# Altium PCB Control_Board.PcbDoc (part 2 of 4)
Units mm, origin at the board's own origin, x right, y up, seen from the top; angles counter-clockwise.
Board outline 90.17 x 96 mm, 6 copper layers (Top Layer, GND, POWER, Signal, PGND, Bottom Layer), stack 1.346 mm thick; 251 components, 196 nets, 963 pads, 633 vias.
Unrouted connection lines stored in the file: 3.
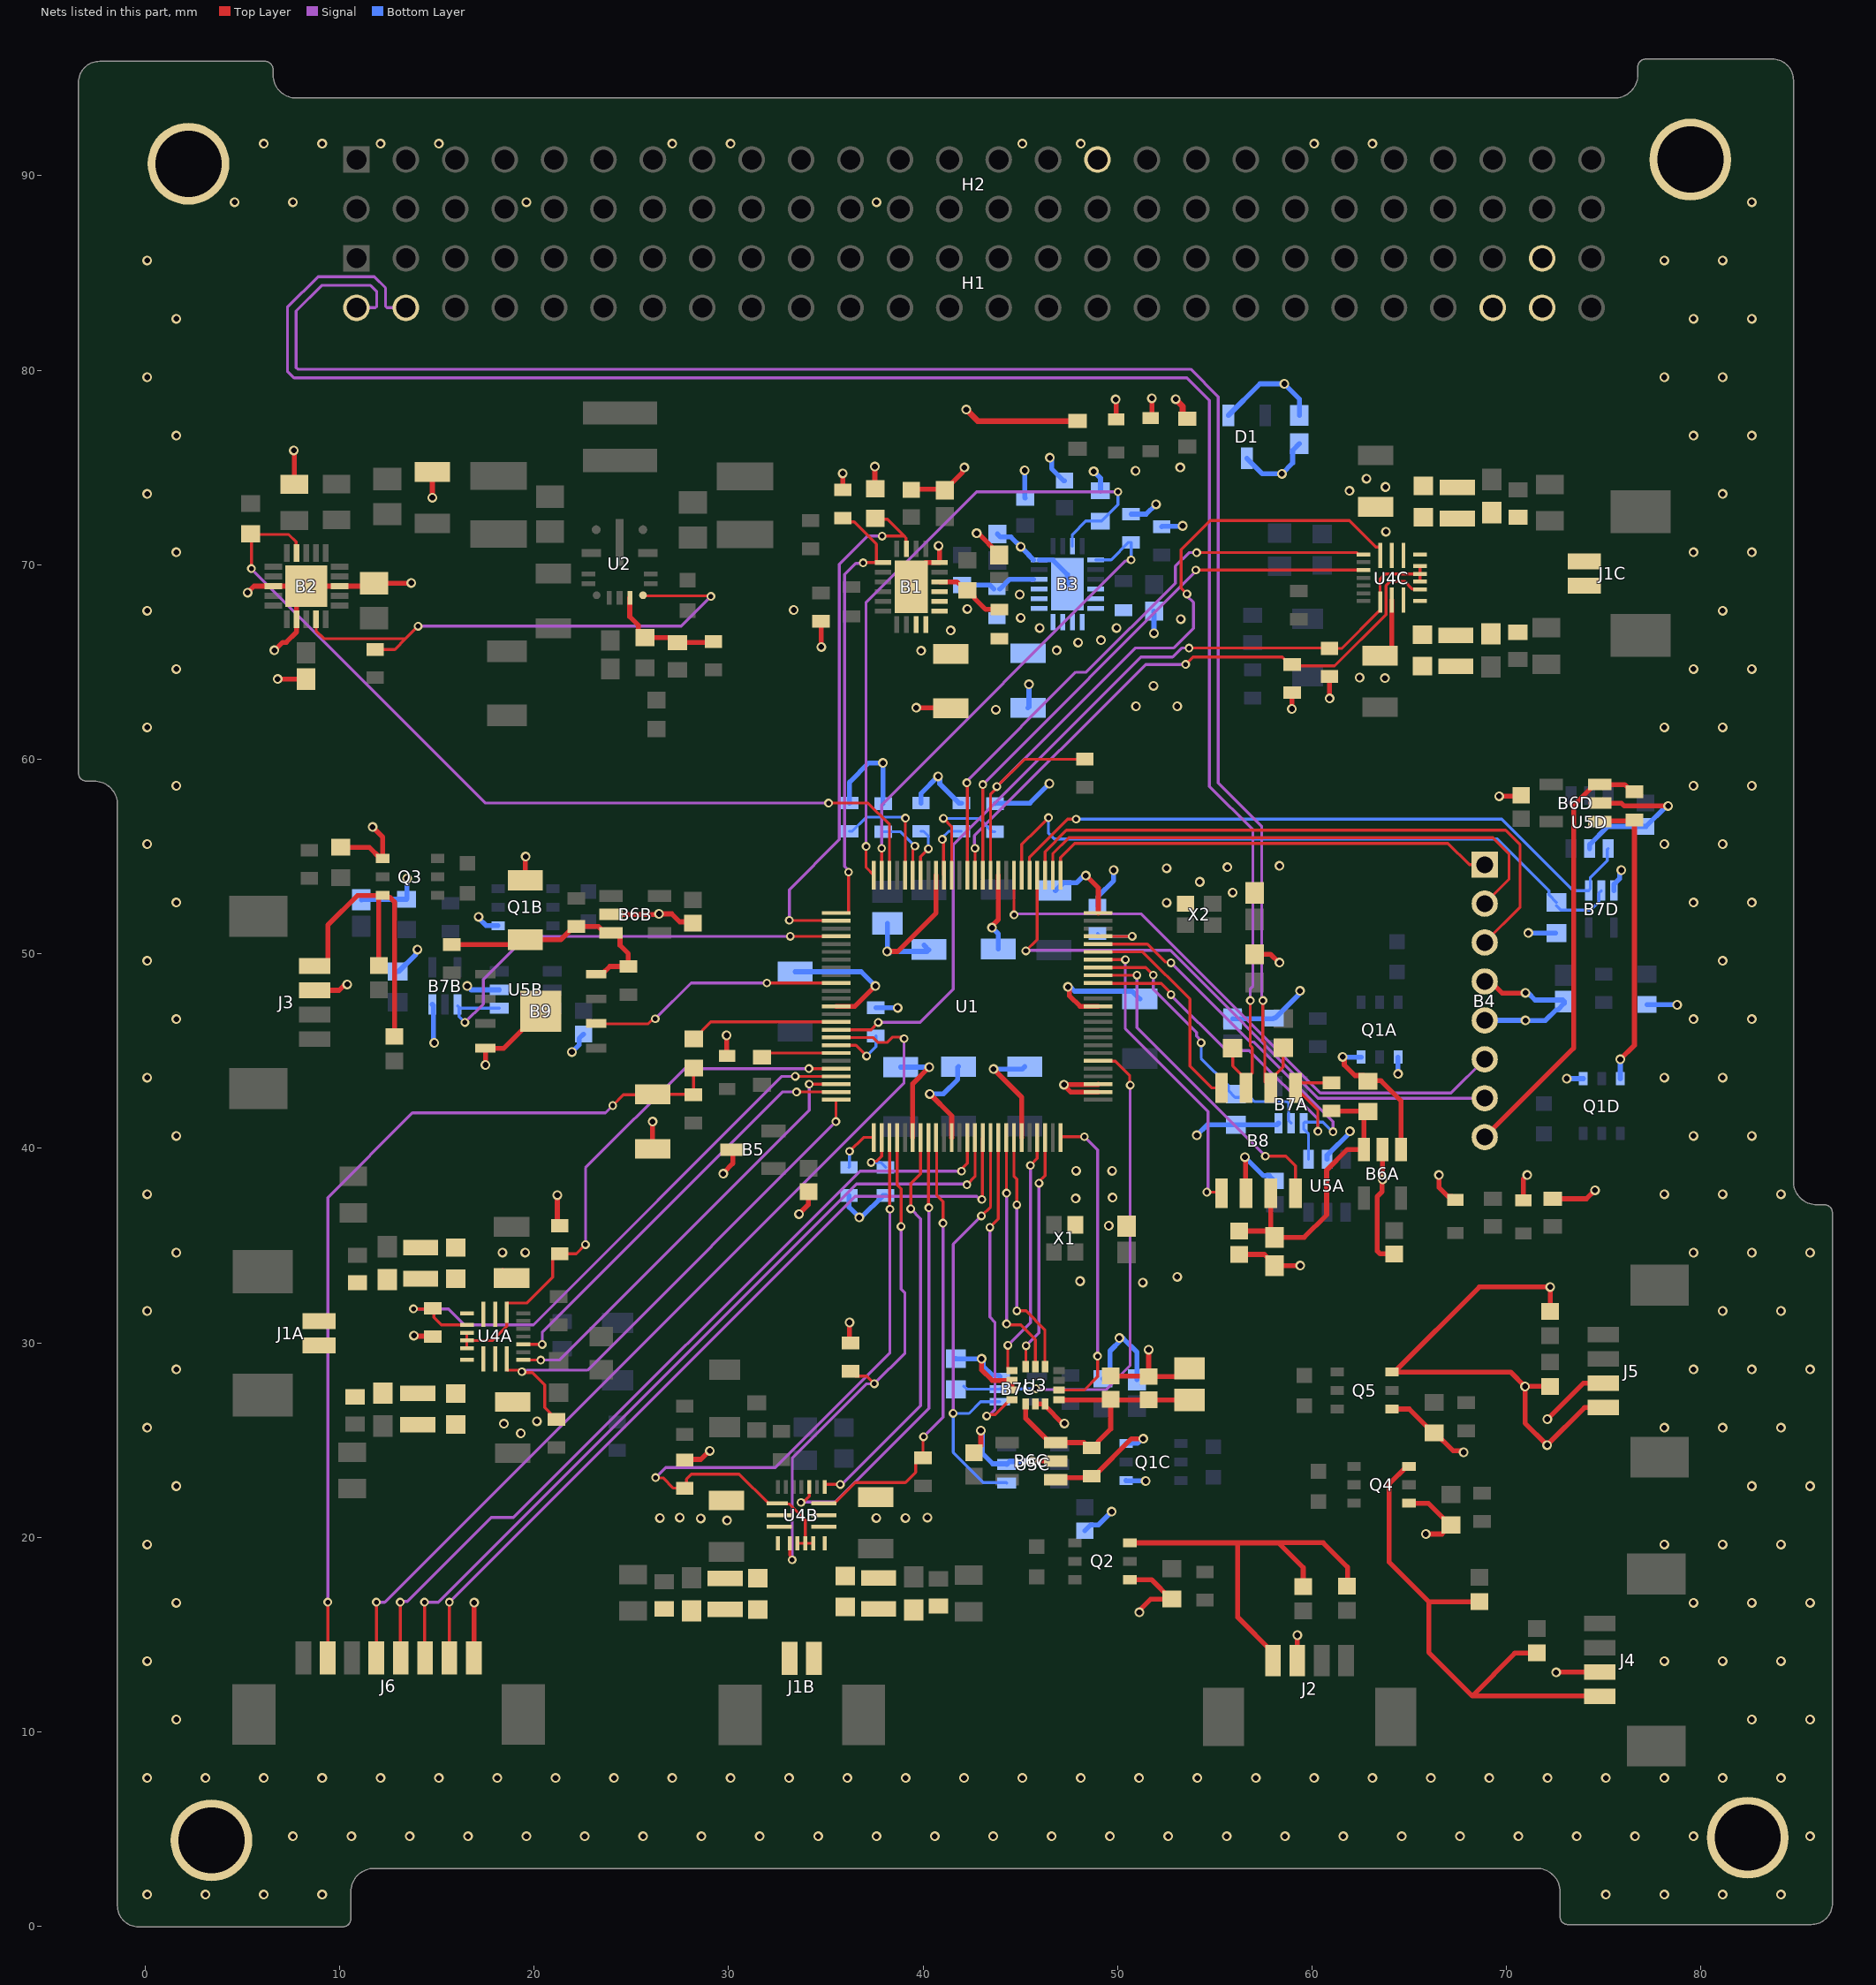
[diagram p6: the nets of this part, all layers, seen from the top]

## Part data
B1 B3: library part CMP-011-00016-1, "2.7V-18V Automotive Current-Limited Load Switch with Current Sense & Short-to-Battery Protection", Manufacturer_Name="Texas Instruments", Mouser Part Number=595-TPS25940AQRVCRQ1, Datasheet Link=http://www.ti.com/lit/gpn/tps25940-q1, Design Item ID=TPS25940AQRVCRQ1, Geometry.Height=0.8mm, Manufacturer_Part_Number=TPS25940AQRVCRQ1, Mouser Price/Stock=https://www.mouser.co.uk/ProductDetail/Texas-Instruments/TPS25940AQRVCRQ1?qs=osPbIpHqQ9Uam0Tf4VM8lQ%3D%3D, Source=TPS25940AQRVCRQ1.SchLib
B2: library part CMP-306-000000-1, "Automotive 2A High-Accuracy Low-Noise Low-Dropout (LDO) Voltage Regulator", Manufacturer_Name="Texas Instruments", Mouser Part Number=595-TPS7A5201QRGRRQ1, Datasheet Link=http://www.ti.com/lit/gpn/tps7a52-q1, Design Item ID=TPS7A5201QRGRRQ1, Geometry.Height=1mm, Manufacturer_Part_Number=TPS7A5201QRGRRQ1, Mouser Price/Stock=https://www.mouser.co.uk/ProductDetail/Texas-Instruments/TPS7A5201QRGRRQ1?qs=1mbolxNpo8cdxsbFt%252By4TQ%3D%3D, Source=TPS7A5201QRGRRQ1.SchLib
B4: library part CMP-398-000000-3, "Compact Board-Mounted Magnetometer", Design Item ID=RM3100_W, Source=RM3100-CB.SchLib
B5: library part CMP-226-000000-1, "Temperature to Voltage Converter", Manufacturer_Name=Microchip, Mouser Part Number=579-TC1047AVNBTR, Datasheet Link=https://datasheet.datasheetarchive.com/originals/distributors/Datasheets-304/55284.pdf, Design Item ID=TC1047AVNBTR, Geometry.Height=1.12mm, Manufacturer_Part_Number=TC1047AVNBTR, Mouser Price/Stock=https://www.mouser.co.uk/ProductDetail/Microchip-Technology/TC1047AVNBTR?qs=RnzODY3cU8tj%252BFOzpvF4Qg%3D%3D, Source=TC1047AVNBTR.SchLib
B6A B6B B6C B6D: library part CMP-014-00005-3, "AEC-Q100, 26-V, low-/high-side, voltage output current sense amplifier", Manufacturer_Name="Texas Instruments", Mouser Part Number=595-INA180B2QDBVRQ1, Datasheet Link=http://www.ti.com/lit/gpn/INA180-Q1, Design Item ID=INA180B2QDBVRQ1, Geometry.Height=1.45mm, Manufacturer_Part_Number=INA180B2QDBVRQ1, Mouser Price/Stock=https://www.mouser.co.uk/ProductDetail/Texas-Instruments/INA180B2QDBVRQ1?qs=9r4v7xj2Lnm44%2Fgl%2FBjV6g%3D%3D, Source=INA180B2QDBVRQ1.SchLib
B7A B7B B7C B7D: library part CMP-218-000000-3, "74AUP1G08-Q100 - Low-power 2-input AND gate@en-us", Manufacturer_Name=Nexperia, Mouser Part Number=771-74AUP1G08GWQ100H, Datasheet Link=https://assets.nexperia.com/documents/data-sheet/74AUP1G08_Q100.pdf, Design Item ID=74AUP1G08GW-Q100H, Geometry.Height=1.1mm, Manufacturer_Part_Number=74AUP1G08GW-Q100H, Mouser Price/Stock=https://www.mouser.co.uk/ProductDetail/Nexperia/74AUP1G08GW-Q100H?qs=5XOdhvmYM0Mwp8ByWVd8CQ%3D%3D, Source=74AUP1G08GW-Q100H.SchLib
B8: library part CMP-348-000000-1, "CAN Interface IC", Manufacturer_Name="Texas Instruments", Mouser Part Number=595-TCAN337GD, Datasheet Link=https://www.arrow.com/en/products/tcan337gd/texas-instruments, Design Item ID=TCAN337GD, Geometry.Height=1.75mm, Manufacturer_Part_Number=TCAN337GD, Mouser Price/Stock=https://www.mouser.co.uk/ProductDetail/Texas-Instruments/TCAN337GD?qs=gMfM3zrbS4qmjQESf%252BTgJw%3D%3D, Source=TCAN337GD.SchLib
B9: library part CMP-071-000002-1, "MRAM 4Mb 3.3V 512Kx8 SPI MRAM", Manufacturer_Name="Everspin Technologies", Mouser Part Number=936-MR25H40VDF, __ORIG_LIFECYCLESTATEGUID__=706004B5-C76E-482E-903B-BA0E4FAE086A, Datasheet Link=https://www.everspin.com/getdatasheet/MR25H40, Design Item ID=MR25H40VDF, Geometry.Height=0.9mm, Manufacturer_Part_Number=MR25H40VDF, Mouser Price/Stock=https://www.mouser.co.uk/ProductDetail/Everspin-Technologies/MR25H40VDF?qs=wUXugUrL1qy8G9iN6Ia%2F%2FQ%3D%3D, Source=MR25H40VDF.SchLib
C1 C13 C22 C27: library part CMP-001-00115-2, "SMD Auto C0G, Ceramic, 0.1 uF, 10%, 25 VDC, 62.5 VDC, 125C, -55C, C0G, SMD, MLCC, Ultra-Stable, Low Loss, Automotive Grade, 0.1 % , 10 GOhms, 36 mg, 1206, 3.2mm, 1.6mm, 1.6mm, 0.5mm, 2000, 78  Weeks, 120", Manufacturer_Name=KEMET, Mouser Part Number=80-C1206C104K3GAUTO, Datasheet Link=https://content.kemet.com/datasheets/KEM_C1022_C0G_AUTO_SMD.pdf, Design Item ID=C1206C104K3GACAUTO, Geometry.Height=1.8mm, Manufacturer_Part_Number=C1206C104K3GACAUTO, Mouser Price/Stock=https://www.mouser.co.uk/ProductDetail/KEMET/C1206C104K3GACAUTO?qs=iLbezkQI%252BsiL409OZdKKSA%3D%3D, Source=C1206C104K3GACAUTO.SchLib
C2 C3 C4 C5 C6 C7 C8 C10 C50: library part CMP-001-00131-4, "SMD Auto C0G, Ceramic, 0.1 uF, 5%, 16 VDC, C0G, SMD, MLCC, Ultra-Stable, Low Loss, Automotive Grade, 1206", Manufacturer_Name=Kemet, Copyright="Copyright (C) 2025 Ultra Librarian. All rights reserved.", Design Item ID=C1206C104J4GACAUTO, Manufacturer_Part_Number=C1206C104J4GACAUTO, Source=C1206C104J4GACAUTO.SchLib
C9 C30: library part CMP-001-00121-2, "SMD Auto X7R Flex, Ceramic, 10 uF, 10%, 10 VDC, 25 VDC, 125C, -55C, X7R, SMD, MLCC, FT-CAP, Automotive Grade, 10 % , 10 MOhms, 21 mg, 0805, 2mm, 1.25mm, 1.25mm, 0.75mm, 0.5mm, 10000, 78  Weeks, 80", Capacitance=10uF, Manufacturer_Name=YAGEO, Mouser Part Number=80-C0805X106K8RAUTLR, Datasheet Link=https://content.kemet.com/datasheets/KEM_C1078_X7R_FT-CAP_AUTO_SMD.pdf, Design Item ID=C0805X106K8RACAUTO7210, Geometry.Height=1.45mm, Manufacturer_Part_Number=C0805X106K8RACAUTO7210, Mouser Price/Stock=https://www.mouser.co.uk/ProductDetail/KEMET/C0805X106K8RACAUTO7210?qs=HXFqYaX1Q2whBpVr4Bdd3g%3D%3D, Source=C0805X106K8RACAUTO7210.SchLib
C11 C12 C18 C46A C46B C46C C46D: library part CMP-001-00116-2, "SMD Auto C0G Flex, Ceramic, 0.01 uF, 1%, 25 VDC, C0G, SMD, MLCC, FT-CAP, Ultra-Stable, Automotive Grade, 0603", Manufacturer_Name=Kemet, Copyright="Copyright (C) 2025 Ultra Librarian. All rights reserved.", Design Item ID=C0603X103F3GACAUTO, Manufacturer_Part_Number=C0603X103F3GACAUTO, Source=C0603X103F3GACAUTO.SchLib
C14 C29: "Multilayer Ceramic Capacitors MLCC - SMD/SMT 2700 pF 50 VDC 1% 0603 C0G (NP0) AEC-Q200", Capacitance=2.7nF, Manufacturer_Name="Murata Electronics", Datasheet Link=https://search.murata.co.jp/Ceramy/image/img/A01X/G101/ENG/GCM1885C1H272FA16-01A.pdf, Height=0.9mm, Manufacturer_Part_Number=GCM1885C1H272FA16J
C15: "Multilayer Ceramic Capacitors MLCC - SMD/SMT 50V 0.01uF C0G 0805 1% Flex AEC-Q200", Capacitance=10nF, Manufacturer_Name="Yageo Group", Mouser Part Number=80-C0805X103F5GAUTO, Datasheet Link=https://www.yageogroup.com/content/datasheet/asset/file/KEM_C1062_C0G_FT-CAP_SMD, Height=1.1mm, Manufacturer_Part_Number=C0805X103F5GACAUTO, Mouser Price/Stock=https://www.mouser.co.uk/ProductDetail/KEMET/C0805X103F5GACAUTO?qs=ds50AKTGxA8kafziiLAE7w%3D%3D
C16: "Multilayer Ceramic Capacitors MLCC - SMD/SMT 10 Vo 10 uF 0805 X7R 5 % AECQ200", Capacitance=10u, Manufacturer_Name="Yageo Group", Mouser Part Number=80-C0805X106J8RAUTO, Arrow Part Number=C0805X106J8RACAUTO, Arrow Price/Stock=https://www.arrow.com/en/products/c0805x106j8racauto/kemet-corporation, Datasheet Link=https://www.yageogroup.com/content/datasheet/asset/file/KEM_C1078_X7R_FT-CAP_AUTO_SMD, Height=1.1mm, Manufacturer_Part_Number=C0805X106J8RACAUTO, Mouser Price/Stock=https://www.mouser.co.uk/ProductDetail/KEMET/C0805X106J8RACAUTO?qs=HXFqYaX1Q2wKi4kcOiFe3g%3D%3D
C17 C39A C39B C39C C40A C40B C40C: library part CMP-001-00127-1, "Capacitor GCM31 L=3.2mm W=1.6mm T=1.6mm", Manufacturer_Name="Murata Electronics", Mouser Part Number=81-GCM31CR71A226KE2L, Datasheet Link=https://search.murata.co.jp/Ceramy/image/img/A01X/G101/ENG/GCM31CR71A226KE02-01A.pdf, Design Item ID=GCM31CR71A226KE02L, Geometry.Height=1.8mm, Manufacturer_Part_Number=GCM31CR71A226KE02L, Mouser Price/Stock=https://www.mouser.co.uk/ProductDetail/Murata-Electronics/GCM31CR71A226KE02L?qs=9UHcxq0qN4vtutbd1jidnA%3D%3D, Source=GCM31CR71A226KE02L.SchLib
C19 C23: "Capacitor", Capacitance=2.2uF, Manufacturer_Name="Yageo Group", Mouser Part Number=80-C0805X225J4RECAUT, Arrow Part Number=C0805X225J4RECAUTO, Arrow Price/Stock=https://www.arrow.com/en/products/c0805x225j4recauto/kemet-corporation, Datasheet Link=https://www.yageogroup.com/content/datasheet/asset/file/KEM_C1090_X7R_ESD, Height=1.1mm, Manufacturer_Part_Number=C0805X225J4RECAUTO, Mouser Price/Stock=https://www.mouser.co.uk/ProductDetail/KEMET/C0805X225J4RECAUTO?qs=55YtniHzbhAubLJhOOO7lw%3D%3D
C20 C21: "Multilayer Ceramic Capacitors MLCC - SMD/SMT 25V 0.22uF C0G 1210 5% Flex AEC-Q200", Capacitance=220nF, Manufacturer_Name="Yageo Group", Mouser Part Number=80-C1210X224J3GAUTO, Datasheet Link=https://www.yageogroup.com/content/datasheet/asset/file/KEM_C1062_C0G_FT-CAP_SMD, Manufacturer_Part_Number=C1210X224J3GACAUTO, Mouser Price/Stock=https://www.mouser.co.uk/ProductDetail/KEMET/C1210X224J3GACAUTO?qs=gZXFycFWdAOsiS4yZkrXAg%3D%3D
C24: library part CMP-001-00126-1, "Multilayer Ceramic Capacitors MLCC - SMD/SMT 50V 22pF C0G 0603 1% Tol", Manufacturer_Name="Kyocera AVX", Mouser Part Number=581-06035A220F4T2A, Datasheet Link=https://componentsearchengine.com/Datasheets/1/06035A220F4T2A.pdf, Design Item ID=06035A220F4T2A, Geometry.Height=0.9mm, Manufacturer_Part_Number=06035A220F4T2A, Mouser Price/Stock=https://www.mouser.com/Search/Refine.aspx?Keyword=581-06035A220F4T2A, Source=06035A220F4T2A.SchLib
C25: library part CMP-001-00135-2, "Multilayer Ceramic Capacitors MLCC - SMD/SMT 100 uF 6.3 VDC 20% 1210 X5R AEC-Q200", Capacitance=100uF, Capacitor Type=Ceramic, Manufacturer_Name="Murata Electronics", Mouser Part Number=81-GRT32ER60J107ME3L, Datasheet Link=https://search.murata.co.jp/Ceramy/image/img/A01X/G101/ENG/GRT32ER60J107ME13-01A.pdf, Design Item ID=GRT32ER60J107ME13L, Geometry.Height=2.7mm, Manufacturer_Part_Number=GRT32ER60J107ME13L, Mouser Price/Stock=https://www.mouser.co.uk/ProductDetail/Murata-Electronics/GRT32ER60J107ME13L?qs=drgMNd%252BkGPOgdf3ISYHnDQ%3D%3D, Source=GRT32ER60J107ME13L.SchLib
C26 C28 C48: library part CMP-001-00117-3, "SMD Auto X7R Flex, Ceramic, 1 uF, 5%, 16 VDC, X7R, SMD, MLCC, FT-CAP, Automotive Grade, 0603", Capacitance=1uF, Manufacturer_Name=Kemet, Copyright="Copyright (C) 2025 Ultra Librarian. All rights reserved.", Design Item ID=C0603X105J4RACAUTO, Manufacturer_Part_Number=C0603X105J4RACAUTO, Source=C0603X105J4RACAUTO.SchLib
C31 C32 C33 C44A C44B C44C C44D C45A C45B C45C C45D C49: library part CMP-001-00103-1, "Multilayer Ceramic Capacitors MLCC - SMD/SMT 16V 0.1uF X7R 0603 5% Flex Soft", Case Code (Imperial)=0603, Case Code (Metric)=1608, Dielectric=X7R, Dielectric Material=Ceramic, Max Operating Temperature=125°C, Min Operating Temperature=-55°C, Tolerance=5%, Voltage=16V, Case/Package=0603, China RoHS=Compliant, Depth=800µm, Dissipation Factor=3.5%, Features="Soft Termination", Height=800µm, Length=1.6mm, Lifecycle Status=Production, Mounting Technology="Surface Mount", Number of Terminals=2, REACH SVHC=Yes, RoHS=Compliant, Schedule B="8532240020, 8532240020", Termination=SMD/SMT, Thickness=863.6µm, Voltage Rating=16V, Voltage Rating (DC)=16V, Width=800µm
C33A C33B C33C C34A C34B C34C C36A C36B C36C: "Multilayer Ceramic Capacitors MLCC - SMD/SMT 16 Vol 1 uF 0603 X7R 10 % AECQ200", Capacitance=1uF, Manufacturer_Name="Yageo Group", Mouser Part Number=80-C0603X105K4RAUTLR, Arrow Part Number=C0603X105K4RACAUTO7411, Arrow Price/Stock=https://www.arrow.com/en/products/c0603x105k4racauto7411/kemet-corporation, Datasheet Link=https://content.kemet.com/datasheets/KEM_C1078_X7R_FT-CAP_AUTO_SMD.pdf, Height=0.87mm, Manufacturer_Part_Number=C0603X105K4RACAUTO7411, Mouser Price/Stock=https://www.mouser.co.uk/ProductDetail/KEMET/C0603X105K4RACAUTO7411?qs=55YtniHzbhCFXoL%252B6qNZhA%3D%3D
C35A C35B C35C: "Multilayer Ceramic Capacitors MLCC - SMD/SMT 0.056 uF 50 VDC 2% 1206 C0G (NP0) AEC-Q200", Capacitance=56nF, Manufacturer_Name="Murata Electronics", Mouser Part Number=81-GCM31M5C1H563GA6L, Datasheet Link=https://search.murata.co.jp/Ceramy/image/img/A01X/G101/ENG/GCM31M5C1H563GA16-01A.pdf, Height=1.25mm, Manufacturer_Part_Number=GCM31M5C1H563GA16L, Mouser Price/Stock=https://www.mouser.co.uk/ProductDetail/Murata-Electronics/GCM31M5C1H563GA16L?qs=QzBtWTOodeXHyUqaFogeLg%3D%3D
C37A C37B C37C C38A C38B C38C: library part CMP-001-00134-1, "1 pF Â±0.1pF 50V Ceramic Capacitor C0G, NP0 0603 (1608 Metric)", Case/Package="0603 Yageo", Check_prices=https://www.snapeda.com/parts/AC0603BRNPO9BN1R0/Yageo/view-part/?ref=eda, Component Type=Standard, Design Item ID=AC0603BRNPO9BN1R0, MF=Yageo, MP=AC0603BRNPO9BN1R0, Pins=2, SnapEDA_Link=https://www.snapeda.com/parts/AC0603BRNPO9BN1R0/Yageo/view-part/?ref=snap, Source=AC0603BRNPO9BN1R0.SchLib
C41A C41B C41C: "430 pF Â±5% 50V Ceramic Capacitor X7R 0603 (1608 Metric)", Capacitance=430pF, Manufacturer_Name="Kyocera AVX", Mouser Part Number=581-06035C431JAT2A, Datasheet Link=https://componentsearchengine.com/Datasheets/1/06031A100FAT2A.pdf, Height=0.9mm, Manufacturer_Part_Number=06035C431JAT2A, Mouser Price/Stock=https://www.mouser.co.uk/ProductDetail/AVX/06035C431JAT2A?qs=qVfB0%2FDaMDZVRmf5AEZuTw%3D%3D
C42A C42B C42C C43A C43B C43C: "Capacitor", Capacitance=10nF, Manufacturer_Name="Kyocera AVX", Mouser Part Number=581-0603ZC103M4T2A, Datasheet Link=https://componentsearchengine.com/Datasheets/1/06031A100FAT2A.pdf, Height=0.9mm, Manufacturer_Part_Number=0603ZC103M4T2A, Mouser Price/Stock=https://www.mouser.com/Search/Refine.aspx?Keyword=581-0603ZC103M4T2A
C47: library part CMP-001-00119-3, "ESD SMD Auto C0G, Ceramic, 4700 pF, 1%, 25 VDC, C0G, SMD, MLCC, Temperature Stable, Electro Static Discharge, Automotive Grade, 0603", Manufacturer_Name=Kemet, Copyright="Copyright (C) 2026 Ultra Librarian. All rights reserved.", Datasheet=https://content.kemet.com/datasheets/KEM_C1091_C0G_ESD.pdf, Design Item ID=C0603C472F3GECAUTO, Manufacturer_Part_Number=C0603C472F3GECAUTO, Source=C0603C472F3GECAUTO.SchLib
D1: "Diode ESD (Uni-directional)", Manufacturer_Name=Vishay, Datasheet Link=https://www.vishay.com/docs/86326/vgsot03-vgsot36.pdf, Height=1.12mm, Manufacturer_Part_Number=VGSOT04-HG3-08
H1 H2: library part CMP-002-00072-1, Case/Package=None, Availability=Unavailable, Component Type=Standard, Design Item ID=ESQ-126-12-G-D, MP=ESQ-126-12-G-D, Pins=52, Price=None, Source=ESQ-126-12-G-D.SchLib
J1A J1B J1C: "1.25mm Pitch, PicoBlade PCB Header, Single Row, Right-Angle, Surface Mount, Tin (Sn) Plating, Friction Lock, 2 Circuits, Natural, Tape and Reel", Manufacturer_Name="Molex Connector Corporation", Copyright="Copyright (C) 2025 Ultra Librarian. All rights reserved.", Manufacturer_Part_Number=532610271, RefDes=RefDes, Type=Type
J2 J3 J4 J5: "Connector", Manufacturer_Name=Molex, Mouser Part Number=538-53261-0471, Arrow Part Number=53261-0471, Arrow Price/Stock=null?region=nac, Datasheet Link=http://www.molex.com/webdocs/datasheets/pdf/en-us//0532610471_PCB_HEADERS.pdf, Manufacturer_Part_Number=53261-0471, Mouser Price/Stock=https://www.mouser.co.uk/ProductDetail/Molex/53261-0471?qs=%252B72YyncTwW9e3et3PwnEMw%3D%3D
J6: library part CMP-002-00084-1, "1.25mm Pitch, PicoBlade PCB Header, Single Row, Right-Angle, Surface Mount, Gold (Au) Flash Plating, Friction Lock, 8 Circuits, Natural, Tape and Reel", Manufacturer_Name="Molex Connector Corporation", Copyright="Copyright (C) 2026 Ultra Librarian. All rights reserved.", Design Item ID=532614008, Manufacturer_Part_Number=532614008, RefDes=RefDes, Source=532614008.SchLib, Type=Type
L1: library part CMP-006-00031-1, "Size 4020; L = 0.82 ÂµH Â±20%; IR = 10.80 A; Isat = 11.60 A; RDCmax = 11.0 mâ„", Case/Package=None, Check_prices=https://www.snapeda.com/parts/744393230082/Wurth+Electronics/view-part/?ref=eda, Component Type=Standard, Design Item ID=WE-XHMI_4020, MF="Wurth Elektronik", MP=744393230082, Pins=2, SnapEDA_Link=https://www.snapeda.com/parts/744393230082/Wurth+Electronics/view-part/?ref=snap, Source=WE-XHMI_4020.SchLib
L2A L2B L2C L3A L3B L3C: "FIXED IND 4.7UH 1.1A 175 MOHM", Inductance=4.7uH, Manufacturer_Name="Murata Electronics", Mouser Part Number=81-LQM2MPZ4R7MG0L, Datasheet Link=https://search.murata.co.jp/Ceramy/image/img/P02/JELF243B-9109.pdf, Height=1mm, Manufacturer_Part_Number=LQM2MPZ4R7MG0L, Mouser Price/Stock=https://www.mouser.com/Search/Refine.aspx?Keyword=81-LQM2MPZ4R7MG0L
LED1 LED2 LED3 LED4 LED5: library part CMP-007-00036-1, "CHIPLED(SMD 0603-LED) GREEN U.BRIGHT-e4", Manufacturer_Name=Vishay, Copyright="Copyright (C) 2025 Ultra Librarian. All rights reserved.", Design Item ID=TLMG1100-GS15, Manufacturer_Part_Number=TLMG1100-GS15, RefDes=RefDes, Source=TLMG1100-GS15.SchLib, Type=Type
Q1A Q1B Q1C Q1D Q2 Q3 Q4 Q5: library part CMP-382-000000-1, "N-ch + P-ch MOSFET, 30 V/-20 V, 4 A/-4 A, 0.0391 Î©@4.5V/0.045 Î©@10V, TSOP6F", Manufacturer_Name="Toshiba Electronic Devices & Storage Corp.", Copyright="Copyright (C) 2026 Ultra Librarian. All rights reserved.", Datasheet=https://toshiba.semicon-storage.com/info/docget.jsp?did=63678&prodName=SSM6L820R, Design Item ID=SSM6L820R,LXHF, Manufacturer_Part_Number=SSM6L820R,LXHF, RefDes=RefDes, Source=SSM6L820R,LXHF.SchLib, Type=Type
R1 R4 R5 R6 R9 R11 R12 R13 R14 R15 R22 R27 R34 R42 R46 R49A R49B R49C R53A R53B R53C R57A R57B R57C R57D R64 R74 R75 R76 R77 R82 R83: library part CMP-009-00245-3, "Thin Film Resistors - SMD 0603 10Kohm 0.1% 10ppm AEC-Q200", Case/Package=None, Availability=Unavailable, Component Type=Standard, Design Item ID=ERA3ARB103V, MP=ERA3ARB103V, Pins=2, Price=None, Source=ERA3ARB103V.SchLib
R2 R32: library part CMP-009-00227-2, "D11/CRCW0603 100 1K 1% ET1 e3", Manufacturer_Name=Vishay, Copyright="Copyright (C) 2026 Ultra Librarian. All rights reserved.", Design Item ID=CRCW06031K00FKEA, Manufacturer_Part_Number=CRCW06031K00FKEA, Source=CRCW06031K00FKEA.SchLib
R3 R19 R23 R36 R37: library part CMP-009-00216-2, "MCT 0603-25 0.1% AT P1 75K", Manufacturer_Name=Vishay, Copyright="Copyright (C) 2025 Ultra Librarian. All rights reserved.", Design Item ID=MCT0603MD7502BP100, Manufacturer_Part_Number=MCT0603MD7502BP100, Source=MCT0603MD7502BP100.SchLib
R17 R18 R38 R39: library part CMP-009-00240-1, "WRIS-RSKS Thick Film Resistor, size 0603, 110kO, +/-1%, 100mW", Case/Package=0603, Limiting Element Voltage=75V, Manufacturer="Wurth Elektronik", Max Operating Temperature=155°C, Min Operating Temperature=-55°C, Rated Power=100mW, Resistance Tolerance=+/-1%, Temperature Coefficient of Resistance Max=100ppm/°C, Temperature Coefficient of Resistance Min=-100ppm/°C, Category="Thick Film Resistors", Component Type=Standard, ComponentLink1Description="Website Link", ComponentLink1URL=https://www.we-online.com/redexpert/article/560112116148?ad, ComponentLink2Description="Datasheet Link", ComponentLink2URL=https://www.we-online.com/redexpert/spec/560112116148?ad, Design Item ID=560112116148, Height=0.45mm, Length=1.6mm, Manufacturer Part Number=560112116148, Match Code=WRIS-RSKS, Mount="Surface Mount", Packaging="Tape and Reel", Pins=2, Source=WRIS-RSKS.SchLib, Width=0.8mm
R20 R40: library part CMP-009-00210-1, Case/Package=None, Availability=Unavailable, Component Type=Standard, Design Item ID=RQ73C1J3K4BTD, MP=RQ73C1J3K4BTD, Pins=2, Price=None, Source=RQ73C1J3K4BTD.SchLib
R21: library part CMP-009-00261-1, "Series/Type: High Precision Thick Film Chip Resistors , Power Rating (W): 0.2, Chip Size (LxW(EIA)) (mm): 1.6 x 0.8 (EIA:0603), Resistance Values (â„", Case/Package="603-2 Panasonic", Check_prices=https://www.snapeda.com/parts/ERJ-PB3B3572V/Panasonic/view-part/?ref=eda, Component Type=Standard, Design Item ID=ERJ-PB3B3572V, MF=Panasonic, MP=ERJ-PB3B3572V, Pins=2, SnapEDA_Link=https://www.snapeda.com/parts/ERJ-PB3B3572V/Panasonic/view-part/?ref=snap, Source=ERJ-PB3B3572V.SchLib
R24 R43: library part CMP-009-00241-1, "Res Thin Film 0603 24.9K Ohm 1% 0.125W(1/8W) Â±100ppm/C Sulfur Resistant Pad SMD T/R", Case/Package="1508 Stackpole", Check_prices=https://www.snapeda.com/parts/RNCP0603FTD24K9/Stackpole+Electronics/view-part/?ref=eda, Component Type=Standard, Design Item ID=RNCP0603FTD24K9, MF="Stackpole Electronics Inc", MP=RNCP0603FTD24K9, Pins=2, SnapEDA_Link=https://www.snapeda.com/parts/RNCP0603FTD24K9/Stackpole+Electronics/view-part/?ref=snap, Source=RNCP0603FTD24K9.SchLib
R25: library part CMP-009-00243-2, "37.4 kOhms ±1% 0.125W, 1/8W Chip Resistor 0603 (1608 Metric) Anti-Sulfur Thin Film", Case/Package=None, Availability=Unavailable, Component Type=Standard, Design Item ID=RNCP0603FTD37K4, MP=RNCP0603FTD37K4, Pins=2, Price=None, Source=RNCP0603FTD37K4.SchLib
R26: library part CMP-009-00266-2, "16.2 kOhms ±1% 0.1W, 1/10W Chip Resistor 0603 (1608 Metric) Automotive AEC-Q200 Thick Film", Case/Package=None, Availability=Unavailable, Component Type=Standard, Design Item ID=RMCF0603FT16K2, MP=RMCF0603FT16K2, Pins=2, Price=None, Source=RMCF0603FT16K2.SchLib
R28: library part CMP-009-00233-2, "TNPW0805 11K8 0.1% T-9 E52 e3", Manufacturer_Name=Vishay, Copyright="Copyright (C) 2026 Ultra Librarian. All rights reserved.", Datasheet=https://www.vishay.com/doc?28758, Design Item ID=TNPW080511K8BEEN, Manufacturer_Part_Number=TNPW080511K8BEEN, Source=TNPW080511K8BEEN.SchLib
R29: library part CMP-009-00222-1, "33 kOhms Â±1% 0.125W, 1/8W Chip Resistor 0603 (1608 Metric) Automotive AEC-Q200, Moisture Resistant Thin Film", Case/Package="603 KOA", Check_prices=https://www.snapeda.com/parts/RN73R1JTTD3302F10/KOA+Speer/view-part/?ref=eda, Component Type=Standard, Design Item ID=RN73R1JTTD3302F10, MF="KOA Speer", MP=RN73R1JTTD3302F10, Pins=2, SnapEDA_Link=https://www.snapeda.com/parts/RN73R1JTTD3302F10/KOA+Speer/view-part/?ref=snap, Source=RN73R1JTTD3302F10.SchLib
R30: library part CMP-009-00234-1, "TNPW0805 3K74 0.5% T-9 ET1 E3", Case/Package=None, Availability=Unavailable, Component Type=Standard, Design Item ID=TNPW08053K74DEEA, MP=TNPW08053K74DEEA, Pins=2, Price=None, Source=TNPW08053K74DEEA.SchLib
R31: library part CMP-009-00208-1, "100 kOhms Â±0.05% 0.1W, 1/10W Chip Resistor 0603 (1608 Metric) Anti-Sulfur, Automotive AEC-Q200, Moisture Resistant Thin Film", Case/Package="1608 Vishay", Check_prices=https://www.snapeda.com/parts/TNPU0603100KAZEN00/Vishay/view-part/?ref=eda, Component Type=Standard, Design Item ID=TNPU0603100KAZEN00, MF=Vishay, MP=TNPU0603100KAZEN00, Pins=2, SnapEDA_Link=https://www.snapeda.com/parts/TNPU0603100KAZEN00/Vishay/view-part/?ref=snap, Source=TNPU0603100KAZEN00.SchLib
R33: library part CMP-009-00232-2, "D11/CRCW0603 100 5K76 1% ET1 e3", Manufacturer_Name=Vishay, Copyright="Copyright (C) 2026 Ultra Librarian. All rights reserved.", Datasheet=https://www.vishay.com/doc?20035, Design Item ID=CRCW06035K76FKEA, Manufacturer_Part_Number=CRCW06035K76FKEA, Source=CRCW06035K76FKEA.SchLib
R35: library part CMP-009-00273-1, "Res, Aec-Q200, Thick Film, 38K3, 0603", Case/Package="1608-2 Panasonic", Check_prices=https://www.snapeda.com/parts/ERJ-PA3F3832V/Panasonic/view-part/?ref=eda, Component Type=Standard, Design Item ID=ERJPA3F3832V, MF=Panasonic, MP=ERJ-PA3F3832V, Pins=2, SnapEDA_Link=https://www.snapeda.com/parts/ERJ-PA3F3832V/Panasonic/view-part/?ref=snap, Source=ERJPA3F3832V.SchLib
R41: library part CMP-009-00242-1, "Res Thin Film 0603 35.7K Ohm 1% 0.125W(1/8W) Â±100ppm/C Sulfur Resistant Molded SMD Paper T/R", Case/Package="1508 Stackpole", Check_prices=https://www.snapeda.com/parts/RNCP0603FTD35K7/Stackpole+Electronics/view-part/?ref=eda, Component Type=Standard, Design Item ID=RNCP0603FTD35K7, MF="Stackpole Electronics Inc", MP=RNCP0603FTD35K7, Pins=2, SnapEDA_Link=https://www.snapeda.com/parts/RNCP0603FTD35K7/Stackpole+Electronics/view-part/?ref=snap, Source=RNCP0603FTD35K7.SchLib
R44: library part CMP-009-00263-3, "30.1 kOhms ±1% 0.333W, 1/3W Chip Resistor 0603 (1608 Metric) Automotive AEC-Q200, Pulse Withstanding Thick Film", Manufacturer_Name=Vishay, Resistance=30.1k, Copyright="Copyright (C) 2026 Ultra Librarian. All rights reserved.", Datasheet=https://www.vishay.com/doc?20043, Design Item ID=CRCW060330K1FKEAHP, Manufacturer_Part_Number=CRCW060330K1FKEAHP, Source=CRCW060330K1FKEAHP.SchLib
R45: library part CMP-009-00260-1, "13.3 kOhms Â±1% 0.333W, 1/3W Chip Resistor 0603 (1608 Metric) Automotive AEC-Q200, Pulse Withstanding Thick Film", Case/Package="1608 Vishay", Check_prices=https://www.snapeda.com/parts/CRCW060313K3FKEAHP/Vishay/view-part/?ref=eda, Component Type=Standard, Design Item ID=CRCW060313K3FKEAHP, MF=Vishay, MP=CRCW060313K3FKEAHP, Pins=2, SnapEDA_Link=https://www.snapeda.com/parts/CRCW060313K3FKEAHP/Vishay/view-part/?ref=snap, Source=CRCW060313K3FKEAHP.SchLib
R47: library part CMP-009-00272-1, "Thick Film Low Ohmic Smnt Resistor 0603 Case 6.2Ohm +/-1%.2W +/-200ppm/C", Case/Package="1608-2 Panasonic", Check_prices=https://www.snapeda.com/parts/ERJ3BQF6R2V/Panasonic/view-part/?ref=eda, Component Type=Standard, Design Item ID=ERJ3BQF6R2V, MF=Panasonic, MP=ERJ3BQF6R2V, Pins=2, SnapEDA_Link=https://www.snapeda.com/parts/ERJ3BQF6R2V/Panasonic/view-part/?ref=snap, Source=ERJ3BQF6R2V.SchLib
R48: library part CMP-009-00271-1, "Thick Film Low Ohmic Smnt Resistor 0603 Case 1Ohm +/-1% 0.2W +/-200ppm/degC", Case/Package="1608-2 Panasonic", Check_prices=https://www.snapeda.com/parts/ERJ3BQF1R0V/Panasonic/view-part/?ref=eda, Component Type=Standard, Design Item ID=ERJ3BQF1R0V, MF=Panasonic, MP=ERJ3BQF1R0V, Pins=2, SnapEDA_Link=https://www.snapeda.com/parts/ERJ3BQF1R0V/Panasonic/view-part/?ref=snap, Source=ERJ3BQF1R0V.SchLib
R50A R50B R50C: "No Description Available", Manufacturer_Name=Panasonic, Copyright="Copyright (C) 2026 Ultra Librarian. All rights reserved.", Manufacturer_Part_Number=ERJ-6ENF2260V
R51A R51B R51C: library part CMP-009-00255-1, "80.6 kOhms 1% 0.1W, 1/10W Chip Resistor 0603 (1608 Metric) Automotive AEC-Q200 Thick Film", Case/Package="1608-2 Panasonic", Check_prices=https://www.snapeda.com/parts/ERJ-3EKF8062V/Panasonic+Electronic+Components/view-part/?ref=eda, Component Type=Standard, Design Item ID=ERJ3EKF8062V, MF=Panasonic, MP=ERJ-3EKF8062V, Pins=2, SnapEDA_Link=https://www.snapeda.com/parts/ERJ-3EKF8062V/Panasonic+Electronic+Components/view-part/?ref=snap, Source=ERJ3EKF8062V.SchLib
R52A R52B R52C R54A R54B R54C: library part CMP-009-00256-1, "Resistor;Thick Film;100 Ohms;0.33 W;1%;SMT;0805;TCR 37 ppm/DegC", Case/Package="2012 Bourns", Check_prices=https://www.snapeda.com/parts/CRCW0805100RFKEAHP/Vishay+Dale/view-part/?ref=eda, Component Type=Standard, Design Item ID=CRCW0805100RFKEAHP, MF=Vishay, MP=CRCW0805100RFKEAHP, Pins=2, SnapEDA_Link=https://www.snapeda.com/parts/CRCW0805100RFKEAHP/Vishay+Dale/view-part/?ref=snap, Source=CRCW0805100RFKEAHP.SchLib
R55A R55B R55C: "No Description Available", Manufacturer_Name=Ohmite, Copyright="Copyright (C) 2026 Ultra Librarian. All rights reserved.", Manufacturer_Part_Number=KDV06FR100ET
R56A R56B R56C: library part CMP-009-00253-1, "RES SMD 3.57K OHM 1% 1/4W 0603", Case/Package="1608-2 Panasonic", Check_prices=https://www.snapeda.com/parts/ERJ-PA3F3571V/Panasonic/view-part/?ref=eda, Component Type=Standard, Design Item ID=ERJPA3F3571V, MF=Panasonic, MP=ERJ-PA3F3571V, Pins=2, SnapEDA_Link=https://www.snapeda.com/parts/ERJ-PA3F3571V/Panasonic/view-part/?ref=snap, Source=ERJPA3F3571V.SchLib
R58A R58B R58C R58D: library part CMP-009-00274-1, "100 kOhms Â±0.05% 0.1W, 1/10W Chip Resistor 0603 (1608 Metric) Anti-Sulfur, Automotive AEC-Q200 Thin Film", Case/Package="1608 Susumu", Check_prices=https://www.snapeda.com/parts/RG1608N-104-W-T1/Susumu/view-part/?ref=eda, Component Type=Standard, Design Item ID=RG1608N-104-W-T1, MF=Susumu, MP=RG1608N-104-W-T1, Pins=2, SnapEDA_Link=https://www.snapeda.com/parts/RG1608N-104-W-T1/Susumu/view-part/?ref=snap, Source=RG1608N-104-W-T1.SchLib
R59A R59B R59C R59D R78 R80 R84 R85: library part CMP-009-00226-2, "D11/CRCW0603-P 50 10K 0.5% ET1 e3", Manufacturer_Name=Vishay, Copyright="Copyright (C) 2026 Ultra Librarian. All rights reserved.", Datasheet=https://www.vishay.com/doc?20036, Design Item ID=CRCW060310K0DHEAP, Manufacturer_Part_Number=CRCW060310K0DHEAP, Source=CRCW060310K0DHEAP.SchLib
R60A R60B R60C R60D R79 R81 R86 R87: library part CMP-009-00220-1, "50 kOhms Â±0.02% 0.1W, 1/10W Chip Resistor 0603 (1608 Metric) Anti-Sulfur, Automotive AEC-Q200, Moisture Resistant Thin Film", Case/Package="1608 Vishay", Check_prices=https://www.snapeda.com/parts/TNPU060350K0HZEN00/Vishay/view-part/?ref=eda, Component Type=Standard, Design Item ID=TNPU060350K0HZEN00, MF=Vishay, MP=TNPU060350K0HZEN00, Pins=2, SnapEDA_Link=https://www.snapeda.com/parts/TNPU060350K0HZEN00/Vishay/view-part/?ref=snap, Source=TNPU060350K0HZEN00.SchLib
R61: library part CMP-009-00270-1, "124 mOhms Â±1% 0.25W, 1/4W Chip Resistor 0603 (1608 Metric) Automotive AEC-Q200, Current Sense, Moisture Resistant Thick Film", Case/Package="603 KOA", Check_prices=https://www.snapeda.com/parts/SR731JTTDR124F/KOA+Speer/view-part/?ref=eda, Component Type=Standard, Design Item ID=SR731JTTDR124F, MF="KOA Speer", MP=SR731JTTDR124F, Pins=2, SnapEDA_Link=https://www.snapeda.com/parts/SR731JTTDR124F/KOA+Speer/view-part/?ref=snap, Source=SR731JTTDR124F.SchLib
R62 R63: library part CMP-020-000000-1, "Thin Film Resistors - SMD P 0603 Y 60R0 B B TR", Manufacturer_Name=Vishay, Datasheet Link=https://www.vishay.com/docs/53017/p.pdf, Design Item ID=P0603Y60R0BBT, Geometry.Height=0.63mm, Manufacturer_Part_Number=P0603Y60R0BBT, Source=P0603Y60R0BBT.SchLib
R65 R66 R67 R68 R69 R70 R71 R72: library part CMP-009-00179-2, "Fixed Resistor, Thin Film, 0.1W, 4700ohm, 100V, 0.5% +/-Tol, 10ppm/Cel, Surface Mount, 0603", Case/Package=0603, Max Operating Temperature=155°C, Min Operating Temperature=-55°C, Package Height=0.4mm, Package Length=1.6mm, Package Width=0.8mm, Power=166.7mW, Rated Temperature=70°C, Resistor Type="FIXED RESISTOR", Temperature Coefficient (ppm/Cel)=10, Tolerance=0.5%, Working Voltage=100V, Additional Feature="ANTI-SULFUR, PRECISION", Construction=Rectangular, JESD-609 Code=e3, Mounting Technology="Surface Mount", Packaging="Tape and Reel", Pins=2, Reach SVHC Compliant=Yes, Reference Standard=AEC-Q200, RoHS Compliant=Yes, Technology="THIN FILM", Terminal Finish=Tin, Termination=Wraparound
R73: library part CMP-009-00269-1, "Res Thick Film 0603 0.24 Ohm 1% 0.25W(1/4W) 300ppm/C Pad SMD Automotive T/R", Case/Package="1608-2 Panasonic", Check_prices=https://www.snapeda.com/parts/ERJ-3BQFR24V/Panasonic/view-part/?ref=eda, Component Type=Standard, Design Item ID=ERJ3BQFR24V, MF=Panasonic, MP=ERJ-3BQFR24V, Pins=2, SnapEDA_Link=https://www.snapeda.com/parts/ERJ-3BQFR24V/Panasonic/view-part/?ref=snap, Source=ERJ3BQFR24V.SchLib
U1: library part CMP-481-000000-2, "32-bit Microcontrollers - MCU 32-Bit MCU 2048KB FL 512KB RAM Crypto", Manufacturer_Name=Microchip, Manufacturer_Part_Number=PIC32MZ2048EFM100-E/PT, Mouser Part Number=579-MZ2048EFM100EPT, Datasheet Link=https://componentsearchengine.com/Datasheets/1/PIC32MZ2048EFM100-E_PT.pdf, Design Item ID=PIC32MZ2048EFM100-E_PT, Geometry.Height=1.2mm, Mouser Price/Stock=https://www.mouser.co.uk/ProductDetail/Microchip-Technology/PIC32MZ2048EFM100-E-PT?qs=r%2FmwOkjQ8utAqJN2CglPVg%3D%3D, Source=PIC32MZ2048EFM100-E_PT.SchLib
U2: library part CMP-226-000001-2, "Automotive 3-V to 36-V, 3-A, low-noise synchronous step-down converter 14-VQFN-HR -40 to 150", Manufacturer_Name="Texas Instruments", Copyright="Copyright (C) 2026 Ultra Librarian. All rights reserved.", Design Item ID=LM61430AASQRJRRQ1, Manufacturer_Part_Number=LM61430AASQRJRRQ1, RefDes=RefDes, Source=LM61430AASQRJRRQ1.SchLib, Type=TYPE
U3: library part CMP-405-000000-3, "Automotive 6-axis IMU (inertial measurement unit): 3-axis accelerometer and 3-axis gyroscope", Manufacturer_Name=STMicroelectronics, Copyright="Copyright (C) 2025 Ultra Librarian. All rights reserved.", Design Item ID=ASM330LHHTR, Manufacturer_Part_Number=ASM330LHHTR, RefDes=RefDes, Source=ASM330LHHTR.SchLib, Type=Type
U4A U4B U4C: "2.5V - 28V 5A H-Bridge Current Regulator", Manufacturer_Name="Monolithic Power Systems", Copyright="Copyright (C) 2026 Ultra Librarian. All rights reserved.", Manufacturer_Part_Number=MP6519GQ-Z, RefDes=RefDes, Type=Type
U5A U5B U5C U5D: library part CMP-031-00019-1, "Automotive micropower comparator with integrated reference pin and push-pull output 6-SOT-23 -40 to 125", Manufacturer_Name="Texas Instruments", Copyright="Copyright (C) 2026 Ultra Librarian. All rights reserved.", Datasheet=https://www.ti.com/lit/gpn/tlv3012b-q1, Design Item ID=TLV3012BQDBVRQ1, Manufacturer_Part_Number=TLV3012BQDBVRQ1, RefDes=RefDes, Source=TLV3012BQDBVRQ1.SchLib, Type=Linear
X1: library part CMP-337-000000-2, "24 MHz TCXO CMOS Oscillator 1.68V ~ 3.63V Enable/Disable 4-SMD, No Lead", Manufacturer_Name=Abracon, Manufacturer_Part_Number=ATXAIG-H13-F-40.000MHZ-F25, Copyright="Copyright (C) 2026 Ultra Librarian. All rights reserved.", Design Item ID=ATXAIG-H13-F-40.000MHZ-F25, RefDes=RefDes, Source=ATXAIG-H13-F-40P000MHZ-F25.SchLib, Type=Oscillators
X2: library part CMP-003-00035-1, "XTAL OSC XO Continuous Volt kHz Automotive", Manufacturer_Name=ABRACON, Mouser Part Number=815-AKDVAIG32768KCT3, Datasheet Link=https://abracon.com/datasheets/ASAKDVAIG.pdf, Design Item ID=ASAKDVAIG-32.768kHz-KC-T3, Geometry.Height=0.8mm, Manufacturer_Part_Number=ASAKDVAIG-32.768kHz-KC-T3, Mouser Price/Stock=https://www.mouser.co.uk/ProductDetail/ABRACON/ASAKDVAIG-32.768kHz-KC-T3?qs=vvQtp7zwQdM6CQP0VQ4oog%3D%3D, Source=ASAKDVAIG-32.768kHz-KC-T3.SchLib

## Free pads (board coordinates)
  round 4.2 hole 3.4: 2(79.453,90.83) 3(2.24,90.61) 4(3.42,4.43) 5(82.4,4.57)

## Via types
v1: diameter 0.5, hole 0.3, Top Layer to Bottom Layer, 487 vias
v2: diameter 0.45, hole 0.25, Top Layer to Bottom Layer, tented both sides, 146 vias

## Nets (pads, with @x,y where several pads share a name; then routed paths per layer and width w, separated by ;. In a path a pad name is that pad's centre, name@x,y a point inside that pad or via, vN(x,y) a via of type N, cw(c..) or ccw(c..) an arc to the next point about the centre after c; other vN are vias at no path point)
3V3-CAN: B6A.3 B8.3 C48.2 C49.1 R61.1 R64.1 | length 15.5
  Top Layer w0.254: C49.1@56.25,35.75 57.753,35.75 57.885,35.618 B8.3@57.885,37.689 ; C48.2@58.075,35.428 59.603,35.428 60.75,36.575 60.75,38.875 61.825,39.95 B6A.3@62.675,39.95 62.675,41.622 62.875,41.822 62.772,41.925 R64.1@61,41.925
3V3-IMU: B6C.3 C30.2 C31.1 C32.1 R47.1 U3.5 U3.8 | length 14.5
  Top Layer w0.254: U3.5@45.28,26.868 45.28,26.12 46.525,24.875 B6C.3@46.825,24.875 48.275,24.875 48.55,24.6 R47.1@48.675,24.6 48.8,24.6 48.998,24.798 48.998,24.923 49.65,25.575 C32.1@49.65,27.1 ; U3.8@46.99,27.074 49.624,27.074 C32.1@49.65,27.1 ; C30.2@53.7,27.065 51.61,27.065 C31.1@51.6,27.075 49.675,27.075 C32.1@49.65,27.1
3V3-MGN: B4.8 B6D.3 R48.1 | length 22.7
  Top Layer w0.254: B4.8@68.88,40.58 73.45,45.15 73.45,57.625 74.327,58.502 74.327,58.527 74.5,58.7 76.075,58.7 76.45,58.325 R48.1@76.575,58.325
3V3-MRAM: B6B.3 B9.8 C50.2 R73.1 R74.2 R75.1 | length 12.8
  Top Layer w0.254: R74.2@15.775,50.475 19.303,50.475 C50.2@19.55,50.722 21.372,50.722 22.05,51.4 R73.1@22.175,51.4 23.325,51.4 23.65,51.075 B6B.3@23.95,51.075 24.25,51.075 24.423,50.902 24.423,50.439 24.85,50.011 R75.1@24.85,49.35 23.895,49.35 23.5,48.955 B9.8@23.2,48.955
3V3-XM: J3.1 Q3.3 R66.1 R68.1 | length 17.3
  Top Layer w0.254: J3.1@8.675,49.425 9.175,49.425 9.398,49.648 9.398,51.473 10.93,53.005 12.025,53.005 Q3.3@12.22,53.005 12.322,52.903 12.597,52.903 12.825,52.675 R68.1@12.825,45.751 ; R66.1@12.025,49.401 Q3.3@12.025,52.903
3V3-YM: J5.1 Q5.3 R70.1 R72.1 | length 26.7
  Top Layer w0.254: Q5.3@64.11,28.5 70.213,28.5 v1(70.954,27.759) ; Q5.3@64.224,28.5 68.599,32.875 v1(72.25,32.875) R72.1@72.25,31.626 ; R70.1@72.25,27.767 70.961,27.767 v1(70.954,27.759) ; J5.1@74.975,26.675 74.011,26.675 v1(72.087,24.751) 70.954,25.884 v1(70.954,27.759)
3V3-YP: J4.1 Q4.3 R69.1 R71.1 | length 27.4
  Top Layer w0.254: Q4.3@64.987,23.658 64.873,23.658 63.971,22.756 63.971,18.729 66.001,16.699 ; R71.1@68.6,16.699 66.001,16.699 ; R69.1@71.526,14.049 70.425,14.049 69.337,12.962 69.337,12.937 68.25,11.85 ; J4.1@74.8,11.825 74.775,11.85 68.25,11.85 ; 66.001,16.699 66.001,14.099 68.25,11.85
3V3-ZP: J2.1 Q2.3 R65.1 R67.1 | length 22.3
  Top Layer w0.254: Q2.3@50.637,19.722 56.175,19.722 ; J2.1@58,13.675 58,14.075 56.175,15.9 56.175,19.722 ; 58.278,19.722 56.175,19.722 ; R65.1@59.55,17.476 59.55,18.45 58.275,19.725 60.575,19.725 61.825,18.475 61.825,17.526 R67.1@61.8,17.501
5V: B3.4 B3.5 B3.6 B3.7 B3.8 C28.2 C39A.2 C39B.2 C39C.2 C40A.2 C40B.2 C40C.2 D1.3 R36.2 R39.1 U4A.2 U4A.11 U4B.2 U4B.11 U4C.2 U4C.11 | length 10.5
  Top Layer w0.254: C39A.2@18.4,33.708 18.778,33.33 C39A.2@18.85,33.33 C39A.2@18.994,33.474 ; C39C.2@63.5,65.32 63.725,65.32 64.103,65.698 U4C.2@64.103,68.181 ; R36.2@72.375,37.411 74.111,37.411 v1(74.55,37.85)
  Bottom Layer w0.254: D1.3@56.65,75.475 57.45,74.675 v1(58.45,74.675) 59.002,75.227 59.002,75.874 C28.2@59.35,76.222
  other v1: 29.925,20.875 28.575,20.975 26.475,21 37.6,21 39.1,21 27.5,21.025 40.225,21.025 19.323,25.353 18.454,25.849 20.152,25.976 18.375,34.65 19.55,34.65 63.748,64.175 62.452,64.2 47.975,66 49.152,66.127 49.952,66.748 63.8,71.7 61.927,73.799 63.777,73.998 62.802,74.426
5V-ADCS: B1.9 B1.10 B1.11 B1.12 B1.13 C13.1 H1.48 R17.1 R23.2 | length 6
  Top Layer w0.305: v1(42.225,77.975) 42.814,77.386 R23.2@47.95,77.386
  other v1: 39.9,65.575 41.425,66.625 42.275,67.725
5V-MGTQ: B3.9 B3.10 B3.11 B3.12 B3.13 C27.1 H1.49 H1.50 R37.2 R38.1 | length 1.3
  Top Layer w0.305: v1(52.99,78.514) 52.99,78.496 53.349,78.138 53.349,77.72 53.564,77.504 R37.2@53.59,77.504
  other v1: 46.875,65.6 45.997,66.748 45.025,67.275 44.973,68.469
BSTNFIL1: C33A.1 U4A.4
BSTNFIL2: C33B.1 U4B.4
BSTNFIL3: C33C.1 U4C.4
BSTPFIL1: C34A.1 U4A.9
BSTPFIL2: C34B.1 U4B.9
BSTPFIL3: C34C.1 U4C.9
CAN-COMP: B7A.1 U1.71 U5A.1 | length 20.1
  Top Layer w0.15: U1.71@49.013,50.5 51.538,50.5 52.455,49.582 52.708,49.582 v2(52.75,49.54)
  Signal w0.15: v2(52.75,49.54) 56.817,45.474 56.986,45.474 61.08,41.38 v2(61.08,40.86)
  Bottom Layer w0.15: U5A.1@59.825,39.437 59.825,40.725 59.575,40.975 B7A.1@59.575,41.3 59.625,41.35 60.567,41.35 61.057,40.86 v2(61.08,40.86)
CAN-EN: B7A.2 R58A.2 U1.68 | length 15
  Top Layer w0.15: U1.68@49.013,49.3 51.45,49.3 v2(51.84,48.91)
  Signal w0.15: v2(51.84,48.91) 51.84,48.185 54.065,45.96 54.065,45.769 54.3,45.533 v2(54.3,45.425)
  Bottom Layer w0.15: v2(54.3,45.425) 54.3,44.625 55.699,43.226 55.699,42.976 56.051,42.624 56.826,42.624 57.05,42.4 58.721,42.4 58.8,42.321 58.8,41.425 B7A.2@58.925,41.3
CAN-FAULT: B8.5 R64.2 U1.66 | length 19.5
  Top Layer w0.15: U1.66@49.013,48.5 49.038,48.475 52.25,48.475 52.75,47.975 v2(52.75,47.9) ; v2(60.3,40.875) 60.3,41.966 B8.5@59.155,43.111 59.155,43.125 59.405,43.375 R64.2@61,43.375
  Signal w0.15: v2(52.75,47.9) 52.75,47.875 55.598,45.027 56.773,45.027 60.3,41.5 v2(60.3,40.875)
CAN-RX: B8.4 U1.67 | length 17.2
  Top Layer w0.15: U1.67@49.013,48.9 v2(51,48.9) ; v2(57.6,39.6) 58.65,39.6 59.155,39.095 B8.4@59.155,37.689
  Signal w0.15: v2(51,48.9) 51,46.2 v2(57.6,39.6)
CAN-S: B8.8 U1.70 | length 11.2
  Top Layer w0.15: U1.70@49.013,50.1 51.3,50.1 53.725,47.675 53.725,44.225 54.839,43.111 B8.8@55.345,43.111
CAN-TX: B8.1 U1.69 | length 15.9
  Top Layer w0.15: U1.69@49.013,49.7 v2(50.4,49.7) ; v2(54.595,37.75) 55.284,37.75 B8.1@55.345,37.689
  Signal w0.15: v2(50.4,49.7) 50.4,46.15 54.65,41.9 54.65,37.805 v2(54.595,37.75)
CAN_N: B8.6 H1.02 R63.1 | length 96.6
  Top Layer w0.15: v2(57.475,47.6) 57.475,45.545 57.575,45.445 57.575,43.421 B8.6@57.885,43.111 57.885,43.55 58.52,44.185 R63.1@58.52,45.17
  Signal w0.15: H1.02@10.873,83.21 11.839,83.21 11.918,83.289 11.918,84.042 11.6,84.36 9.089,84.36 7.775,83.046 7.775,80.129 7.854,80.05 53.761,80.05 55.175,78.636 55.175,58.792 57.411,56.556 57.411,47.664 v2(57.475,47.6)
CAN_P: B8.7 H1.04 R62.1 | length 97.7
  Top Layer w0.15: R62.1@55.925,45.161 55.925,44.24 B8.7@56.615,43.55 ; B8.7@56.615,43.111 B8.7@56.615,43.55 ; v2(56.825,47.6) 56.825,45.276 56.925,45.176 56.925,43.86 B8.7@56.615,43.55
  Signal w0.15: H1.04@13.413,83.21 12.447,83.21 12.368,83.289 12.368,84.228 11.786,84.81 8.903,84.81 7.325,83.232 7.325,79.943 7.668,79.6 53.575,79.6 54.725,78.45 54.725,58.606 56.961,56.369 56.961,48.351 56.825,48.215 v2(56.825,47.6)
CAN_VSEN: B6A.1 Q1A.3 R61.2 | length 7.6
  Top Layer w0.254: v1(61.575,44.7) 61.66,44.615 61.66,44.29 62.207,43.743 62.66,43.743 62.926,43.477 63.544,43.477 64.575,42.446 B6A.1@64.575,39.95
  Bottom Layer w0.254: v1(61.575,44.7) 61.585,44.69 Q1A.3@62.525,44.69
DEBUG-LED: R3.2 U1.19 | length 3.9
  Top Layer w0.15: R3.2@31.725,44.686 31.939,44.9 U1.19@35.537,44.9
DEVSLEEP-3V3: B1.1 R22.2 U1.1 | length 23.6
  Top Layer w0.15: U1.1@35.537,52.1 36.15,52.1 36.175,52.125 v2(36.175,54.2) ; R22.2@35.875,72.4 36.077,72.198 36.462,72.198 37.6,71.06 37.6,70.175 B1.1@37.663,70.112 ; v2(36.925,70.1) 36.938,70.112 37.6,70.112 B1.1@37.663,70.112 ; B1.1@37.938,70.112 B1.1@37.663,70.112
  Signal w0.15: v2(36.175,54.2) 36.175,54.288 35.975,54.488 35.975,69.5 36.546,70.071 36.896,70.071 v2(36.925,70.1)
DEVSLEEP-5V: B3.1 R42.2 U1.99 | length 24.8
  Top Layer w0.15: U1.99@37.875,54.038 v2(37.875,55.425)
  Signal w0.15: v2(37.875,55.425) 37.875,57.655 50.417,70.197 50.647,70.197 v2(50.7,70.25)
  Bottom Layer w0.15: B3.1@48.875,70.25 49.675,70.25 50.575,71.15 R42.2@50.7,71.15 v2(50.7,70.25)
EN-SWITCH-3V3: B1.14 R17.2 R20.2 | length 3.6
  Top Layer w0.254: B1.14@40.85,69.125 41.745,69.125 42.22,68.65 R20.2@42.275,68.65 ; R20.2@42.33,68.65 42.638,68.342 42.638,68.287 43.225,67.7 R17.2@43.925,67.7
EN-SWITCH-5V: B3.14 R38.2 R40.2 | length 3.7
  Bottom Layer w0.254: R40.2@42,68.955 43.445,68.955 R38.2@43.65,68.75 ; R38.2@43.95,68.75 44.454,69.254 45.6,69.254 45.603,69.252 B3.14@45.677,69.252
FB-3V3: C24.1 R31.1 R35.2 U2.4 | length 6
  Top Layer w0.254: U2.4@24.925,68.3 24.925,67.331 25.373,66.883 25.373,66.563 25.681,66.255 27.12,66.255 C24.1@27.375,66 C24.1@27.375,66 R35.2@29.175,65.998
GND: B1.16 B1.21 B2.8 B2.12 B2.18 B2.21 B3.16 B3.21 B4.4 B4.5 B5.3 B6A.2 B6B.2 B6C.2 B6D.2 B7A.3 B7B.3 B7C.3 B7D.3 B8.2 B9.4 B9.9 C1.2 C2.1 C3.1 C4.1 C5.1 C6.1 C7.1 C8.1 C9.1 C10.1 C11.1 C12.1 C13.2 C14.2 C16.2 C17.1 C18.1 C27.2 C28.1 C29.2 C30.1 C31.2 C32.2 C33.2 C44A.2 C44B.2 C44C.2 C44D.2 C45A.2 C45B.2 C45C.2 C45D.2 C46A.1 C46B.1 C46C.1 C46D.1 C47.2 C48.1 C49.2 C50.1 D1.1 H2.31 J2.2 J3.2 J4.2 J5.2 J6.8 LED1.1 LED2.1 LED3.1 LED4.1 LED5.1 pad.2 pad.3 pad.4 pad.5 Q1A.1 Q1B.1 Q1C.1 Q1D.1 Q2.1 Q3.1 Q4.1 Q5.1 R4.1 R5.1 R6.1 R9.1 R11.1 R12.1 R13.1 R14.1 R15.1 R21.1 R22.1 R24.1 R25.1 R26.1 R30.1 R41.1 R42.1 R43.1 R44.2 R45.1 R46.1 R49A.2 R49B.2 R49C.2 R55A.1 R55B.1 R55C.1 R58A.1 R58B.1 R58C.1 R58D.1 R60A.1 R60B.1 R60C.1 R60D.1 R79.1 R81.1 R86.1 R87.1 U1.13 U1.31 U1.36 U1.45 U1.52 U1.53 U1.63 U1.75 U1.84 U1.92 U3.2 U3.3 U3.6 U3.7 U5A.2 U5B.2 U5C.2 U5D.2 X1.2 X2.2 | length 264.9
  Top Layer w0.254: v1(5.279,68.571) 5.608,68.9 B2.8@6.6,68.9 B2.21@8.3,68.9 ; v1(6.65,65.6) 6.67,65.6 7.082,66.012 7.262,66.012 7.8,66.55 B2.12@7.8,67.2 7.8,68.4 B2.21@8.3,68.9 ; v1(6.825,64.125) 8.272,64.125 C18.1@8.275,64.122 ; v1(7.65,75.875) 7.675,75.85 R30.1@7.675,74.13 ; J3.2@8.725,48.125 9.979,48.125 10.279,48.425 v1(10.4,48.425) ; R81.1@10.057,55.478 11.532,55.478 12.106,54.905 Q3.1@12.22,54.905 12.22,55.998 v1(11.702,56.517) ; v1(13.695,69.065) 13.679,69.05 C16.2@11.775,69.05 11.625,68.9 B2.18@10,68.9 B2.21@8.3,68.9 ; v1(13.825,30.375) 13.85,30.35 14.775,30.35 R49A.2@14.8,30.325 ; v1(14.775,73.45) C17.1@14.775,74.77 ; J6.8@16.9,13.805 16.925,13.83 v1(16.925,16.65) ; v1(17.51,44.29) 17.51,45.135 B9.4@17.5,45.145 18.445,45.145 B9.9@20.35,47.05 ; C50.1@19.55,53.778 19.55,54.979 v1(19.569,54.998) ; v1(21.2,37.6) 21.2,36.149 R55A.1@21.325,36.024 ; B6B.2@23.95,52.025 26.398,52.025 v1(26.425,52.052) 27.088,52.052 27.493,51.647 28.103,51.647 C44B.2@28.175,51.575 ; C1.2@26.1,39.975 v1(26.1,41.375) ; R55B.1@27.75,23.974 27.788,24.012 28.576,24.012 29.012,24.448 v1(29.041,24.448) ; v1(29.73,38.7) 29.73,38.734 30.22,39.224 30.22,39.925 B5.3@30.225,39.93 ; v1(29.9,45.81) 29.9,44.781 LED1.1@29.92,44.761 ; v1(33.625,36.625) 34.101,37.101 C33.2@34.101,37.775 ; R21.1@34.75,67.025 34.775,67 v1(34.775,65.775) ; U1.13@35.537,47.3 36.5,47.3 v1(37.55,48.35) ; R22.1@35.875,73.85 v1(35.875,74.7) ; v1(36.225,31.05) 36.225,30.05 R49B.2@36.275,30 ; v1(37.525,75.05) 37.525,73.97 R26.1@37.585,73.91 ; v1(38.15,50.125) 38.7,50.125 40.675,52.1 U1.92@40.675,54.038 ; C14.2@39.375,73.878 41.153,73.878 42.04,74.765 42.04,74.915 v1(42.125,75) ; B1.21@39.4,68.875 39.4,69.375 40.148,70.123 40.848,70.123 B1.16@40.85,70.125 40.848,70.127 40.848,70.924 v1(40.799,70.973) ; U1.31@39.475,40.562 39.475,43.325 v1(40.325,44.175) ; v1(39.65,62.65) 41.4,62.65 C13.2@41.425,62.625 ; v1(40.35,42.8) 41.475,41.675 U1.36@41.475,40.562 ; C44C.2@42.625,24.35 42.65,24.35 42.948,24.648 42.948,24.673 42.975,24.7 v1(42.975,25.5) ; v1(42.758,71.62) 42.83,71.62 43.86,70.59 R24.1@43.925,70.59 ; v1(43.01,29.18) 43.01,28.62 43.556,28.074 U3.2@44.57,28.074 U3.3@44.57,27.574 ; v1@43.475,51.325 43.475,51.369 43.875,51.769 U1.84@43.875,54.038 ; v1(43.625,44.075) 45.075,42.625 U1.45@45.075,40.562 ; v1(45.625,23.925) B6C.2@46.825,23.925 ; U3.6@45.78,26.868 U3.7@46.28,26.868 46.28,26.755 47.176,25.859 v1(47.273,25.859) ; v1(47.45,48.3) 47.535,48.215 47.535,47.84 48.075,47.3 U1.63@49.013,47.3 ; v1(48.375,54.025) 49.013,53.387 U1.75@49.013,52.1 ; U1.52@49.013,42.9 47.591,42.9 47.25,43.241 v1(47.25,43.275) 47.262,43.288 49,43.288 U1.53@49.013,43.3 ; C32.2@49.65,28.3 51.575,28.3 C31.2@51.6,28.275 ; v1(49.91,78.5) 49.93,78.48 LED3.1@49.93,77.471 ; Q2.1@50.635,17.825 51.753,17.825 52.743,16.835 R79.1@52.798,16.835 51.707,16.835 51.125,16.253 v1(51.125,16.15) ; v1(51.6,29.65) C31.2@51.6,28.275 ; v1(51.77,78.555) 51.77,77.581 LED5.1@51.82,77.531 ; C30.1@53.7,28.685 53.29,28.275 C31.2@51.6,28.275 ; C49.2@56.25,34.55 57.55,34.55 58.075,34.025 C48.1@58.075,33.972 58.078,33.975 v1(59.4,33.975) ; v1(56.55,39.55) 56.582,39.518 56.582,37.722 B8.2@56.615,37.689 ; C47.2@57.05,49.978 57.866,49.978 58.294,49.55 v1(58.325,49.55) ; v1(58.969,62.589) 58.975,62.595 R49C.2@58.975,63.426 ; J2.2@59.25,13.675 v1(59.25,14.975) ; v1(60.9,63.125) R55C.1@60.9,64.251 ; B6A.2@63.625,39.95 v1(63.625,38.4) 63.6,38.375 63.6,37.773 63.35,37.523 63.35,34.724 63.499,34.575 C44A.2@64.225,34.575 ; Q5.1@64.11,26.6 65,26.6 66.218,25.382 66.328,25.382 67.249,24.46 67.715,24.46 v1(67.8,24.375) ; Q4.1@64.987,21.758 65.982,21.758 67.095,20.645 R86.1@67.15,20.645 66.68,20.175 v1(65.85,20.175) ; v1(66.525,38.625) 66.525,37.996 66.993,37.529 67.197,37.529 LED2.1@67.375,37.351 ; B4.4@68.88,48.58 69.177,48.58 69.782,47.975 70.95,47.975 v1(70.975,48) ; v1(69.625,58.1) 70.7,58.1 C44D.2@70.75,58.15 ; LED4.1@70.875,37.326 70.875,38.433 v1(71.069,38.626) ; v1(72.1,26.077) 73.948,27.925 J5.2@74.975,27.925 ; v1(72.554,13.063) 72.566,13.075 J4.2@74.8,13.075 ; B6D.2@74.8,57.75 75.904,57.75 76.054,57.6 v1(78.31,57.6)